# Altium PCB PCB_Adaptor_Board-v2.0.PcbDoc (part 1 of 3)
Units mm, origin at the board's own origin, x right, y up, seen from the top; angles counter-clockwise.
Board outline 135 x 88.7 mm, 2 copper layers (Top Layer, Bottom Layer), stack 1.57 mm thick; 43 components, 95 nets, 382 pads, 142 vias.
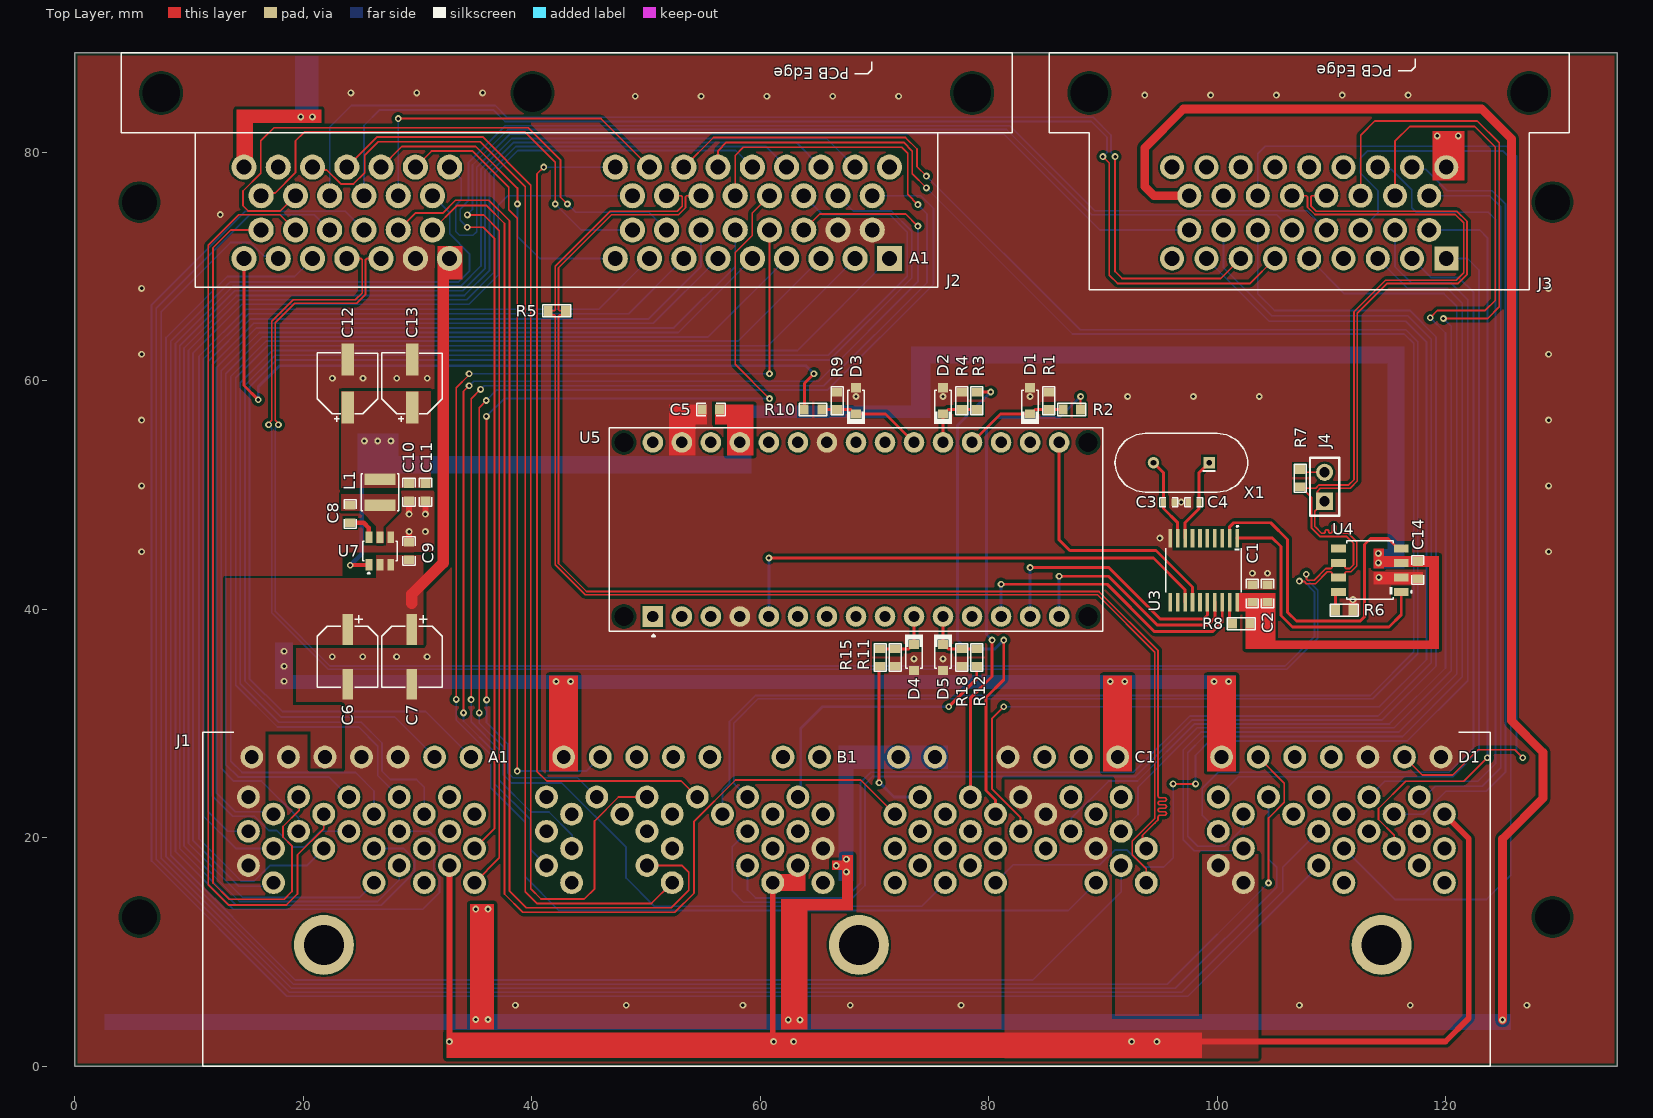
[diagram p0: Top Layer view]
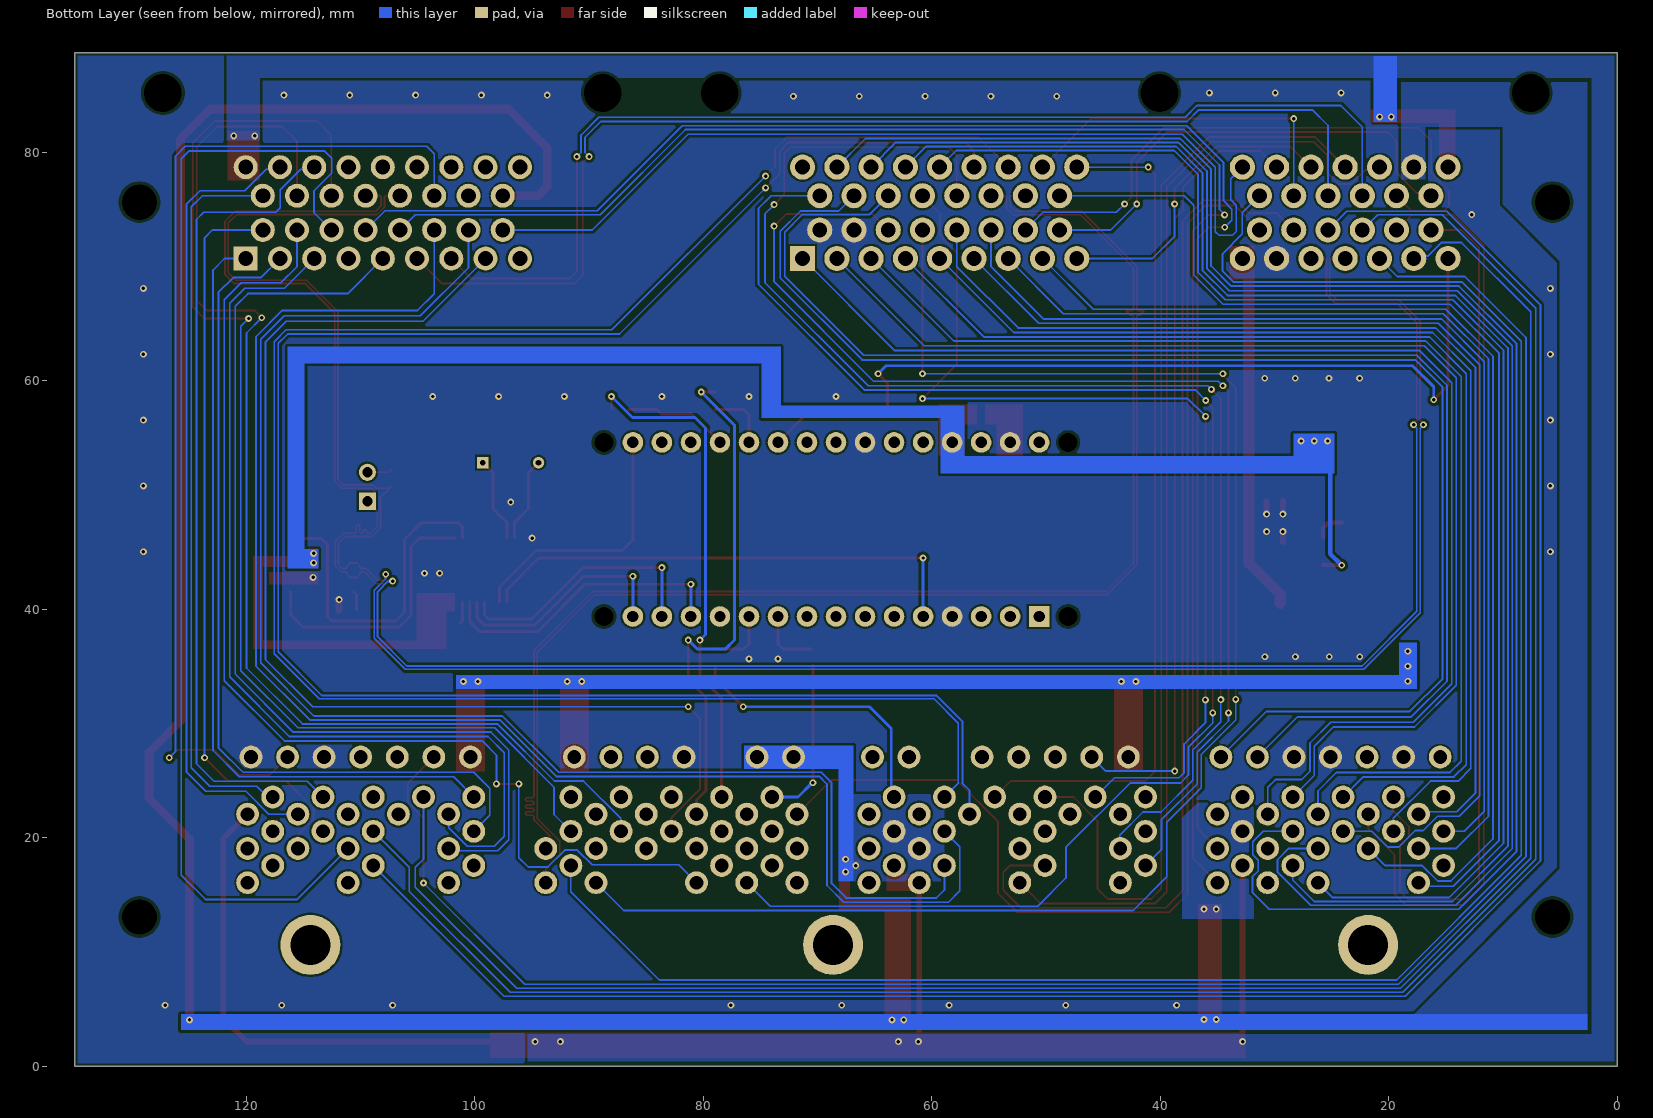
[diagram p1: Bottom Layer view, seen from below]

## Layer stack, top to bottom
Top Solder: solder mask 0.01, Solder Resist, Dk 3.5
Top Layer: signal copper 0.035
Dielectric 1: core 1.5, FR-4, Dk 4.8
Bottom Layer: signal copper 0.035
Bottom Solder: solder mask 0.01, Solder Resist, Dk 3.5

## Board outline
0,0 135,0 135,88.705 0,88.705

## Design rules (kind name [scope] priority, off if disabled: settings)
BoardOutlineClearance [All] p1: gap=0 ignorepadtopadclearanceinfootprint=FALSE except(0.254: Poly-OutlineEdge)
Clearance [All] p1: gap=0.254 ignorepadtopadclearanceinfootprint=FALSE except(0.127: Arc-Arc Arc-Track Track-Track; 0.152: Arc-THPad Track-THPad; 0.178: Track-Via Track-Fill THPad-Poly)
DiffPairsRouting [All] p1: maxlimit=0.14 minlimit=0.14 mostfreqgap=0.14 toplayer_minwidth=0.152 toplayer_maxwidth=0.152 toplayer_prefwidth=0.152 bottomlayer_minwidth=0.152 bottomlayer_maxwidth=0.152 bottomlayer_prefwidth=0.152 impedanceprofiledriven=TRUE impedanceprofileid={C063A5C5-D187-42DF-A67E-2EF729EBF0FC} impedanceprofilevalue=120.000000 maxuncoupledlength=12.7
Height [All] p1: minheight=0 maxheight=38.1 prefheight=25.4
HoleSize [All] p1: absolutevalues=TRUE maxlimit=25.4 minlimit=0.025 maxpercent=80.000 minpercent=20.000
HoleToHoleClearance [All] p1: gap=0 allowstackedmicrovias=TRUE
MatchedLengths "Schematic Matched Net Lengths_5" [InNet('CAN1_P')] p1: tolerance=0.508 checknetsindiffpair=TRUE checkdiffpairvsdiffpair=FALSE checkxsignals=FALSE checkothers=FALSE
MatchedLengths "Schematic Matched Net Lengths_4" [InNet('CAN1_N')] p2: tolerance=0.508 checknetsindiffpair=TRUE checkdiffpairvsdiffpair=FALSE checkxsignals=FALSE checkothers=FALSE
MatchedLengths "Schematic Matched Net Lengths_1" [InNet('CANHH_P')] p3: tolerance=0.508 checknetsindiffpair=TRUE checkdiffpairvsdiffpair=FALSE checkxsignals=FALSE checkothers=FALSE
MatchedLengths "Schematic Matched Net Lengths" [InNet('CANHH_N')] p4: tolerance=0.508 checknetsindiffpair=TRUE checkdiffpairvsdiffpair=FALSE checkxsignals=FALSE checkothers=FALSE
MaxMinImpedance "Schematic Impedance Constraint_5" [InNet('CAN1_P')] p1: minimum=118.0 maximum=120.0
MaxMinImpedance "Schematic Impedance Constraint_4" [InNet('CAN1_N')] p2: minimum=118.0 maximum=120.0
MaxMinImpedance "Schematic Impedance Constraint_1" [InNet('CANHH_N')] p3: minimum=118.0 maximum=120.0
MaxMinImpedance "Schematic Impedance Constraint" [InNet('CANHH_P')] p4: minimum=118.0 maximum=120.0
MinimumSolderMaskSliver [All] p1: minsoldermaskwidth=0
PolygonConnect [All] p1: connectstyle=Direct reliefconductorwidth=0.254 reliefentries=4 polygonreliefangle="90 Angle" airgapwidth=0.254
RoutingVias [All] p1: holewidth=0.3 width=0.6 viastyle="Through Hole" minholewidth=0.3 minwidth=0.6 maxholewidth=0.3 maxwidth=0.6
SilkToSilkClearance [All] p1: silktosilkclearance=0
SilkToSolderMaskClearance [IsPad] p1: minsilkscreentomaskgap=0 clearancetoexposedcopper=TRUE
SolderMaskExpansion [All] p1: expansion=0.102 istentingtop=FALSE
SupplyNets "Schematic Supply Nets_3" [InNet('GND')] p1: voltage=0.000
SupplyNets "Schematic Supply Nets_2" [InNet('AGND')] p2: voltage=0.000
SupplyNets "Schematic Supply Nets_1" [InNet('12V')] p3: voltage=0.000
SupplyNets "Schematic Supply Nets" [InNet('5V_ECU')] p4: voltage=0.000
UnRoutedNet [All] p1: checkbadconnections=TRUE
Width [All] p1: maxlimit=1 minlimit=0.152 preferedwidth=0.178 minimp=50.000000 maximp=50.000000 favimp=50.000000
22 further rules are at their usual default settings.

## Classes and differential pairs
differential pair CAN1: +CAN1_P -CAN1_N
differential pair CANHH: +CANHH_P -CANHH_N

## Components (designator, comment, footprint, x,y, rotation, side; value= is the part's Value field where it differs from the comment)
C1 "10uF" Cap-0603 103.073,41.39 r270 top
C2 "0.1uF" Cap-0603 104.396,41.39 r270 top value=100nF
C3 "22PF" Cap-0402 95.762,49.381 r180 top value=22pF
C4 "22PF" Cap-0402 97.942,49.378 r0 top value=22pF
C5 "10uF" Cap-0603 55.673,57.487 r180 top
C6 "47uF" RVT1E470M0505 23.868,35.84 r270 top
C7 "47uF" RVT1E470M0505 29.502,35.84 r270 top
C8 "0.1uF" Cap-0603 24.105,48.336 r270 top
C9 "10uF" Cap-0603 29.25,45.1 r270 top
C10 "22uF" Cap-0603 29.25,50.248 r90 top
C11 "22uF" Cap-0603 30.683,50.248 r90 top
C12 "47uF" CS1C470M-CRD54 23.884,59.783 r90 top
C13 "47uF" CS1C470M-CRD54 29.517,59.783 r90 top
C14 "0.1uF" Cap-0603 117.551,43.428 r90 top value=100nF
D1 "BZT52C5V1S-7-F" SOD-323 83.613,58.249 r90 top
D2 "BZT52C5V1S-7-F" SOD-323 75.993,58.249 r90 top
D3 "BZT52C5V1S-7-F" SOD-323 68.373,58.249 r90 top
D4 "BZT52C5V1S-7-F" SOD-323 73.453,35.781 r270 top
D5 "BZT52C5V1S-7-F" SOD-323 75.993,35.781 r270 top
J1 "1-1376430-8" 1-1376430-8 67.535,18.842 r0 top locked
J2 "6437288-3" 6437288-3 43.051,77.956 r180 top locked
J3 "6437288-2" 6437288-2 108.051,77.956 r180 top locked
J4 "826629-2" HDR1X2_ 109.398,49.454 r90 top
L1 "4.7uH" SWPA3015S4R7MT_ 26.695,50.248 r90 top
R1 "10K" Res-0603 85.253,58.249 r90 top value=10kR
R2 "18K" Res-0603 87.274,57.487 r180 top
R3 "18K" Res-0603 78.943,58.249 r270 top
R4 "10K" Res-0603 77.633,58.249 r270 top value=10kR
R5 "120R" Res-0603 42.189,66.142 r180 top locked
R6 "0R" Res-0603 111.118,39.923 r0 top
R7 "120R" Res-0603 107.265,51.485 r270 top
R8 "10K" Res-0603 102.102,38.744 r0 top value=10kR
R9 "10K" Res-0603 66.722,58.249 r90 top value=10kR
R10 "18K" Res-0603 64.617,57.487 r0 top
R11 "6.8K" Res-0603 70.503,35.781 r90 top value=6.8kR
R12 "6.8K" Res-0603 78.943,35.781 r90 top value=6.8kR
R15 "4.7K" Res-0603 71.813,35.781 r270 top
R18 "4.7K" Res-0603 77.633,35.781 r90 top
U3 "MCP2515T-I/ST" TSSOP-20 98.811,43.428 r270 top
U4 "TJA1050T/CM,118" SOP-8 113.36,43.428 r180 top
U5 "A000005" A000005 68.373,46.99 r90 top
U7 "AP63205WU-7" TSOT-23-6 26.695,45.1 r90 top
X1 "8Mhz" 71008000RW1 99.292,52.832 r180 top

## Footprints (in the part's own frame and the unit in brackets; to place one, negate y for a bottom-side part, rotate by r counter-clockwise, add the part's x,y. Pads: shape width x height; smd on the part's side, far side on the other; paste and mask are expansions set on the pad)
1-1376430-8 [mm]
  round 2 hole 1.21 paste-2539.97 mask+0: A1(-32.85,8.225) A2(-36.05,8.225) A3(-39.25,8.225) A4(-42.45,8.225) A5(-45.65,8.225) A6(-48.85,8.225) A7(-52.05,8.225) A8(-32.55,3.225) A9(-34.75,4.725) A10(-36.95,3.225) A11(-39.15,4.725) A12(-41.35,3.225) A13(-43.55,4.725) A14(-45.75,3.225) A15(-47.95,4.725) A16(-50.15,3.225) A17(-52.35,4.725) A18(-32.55,0.225) A19(-34.75,1.725) A20(-36.95,0.225) A21(-39.15,1.725) A22(-41.35,0.225) A23(-43.55,1.725) A24(-45.75,0.225) A25(-47.95,1.725) A26(-50.15,0.225) A27(-52.35,1.725) A28(-32.55,-2.775) A29(-34.75,-1.275) A30(-36.95,-2.775) A31(-39.15,-1.275) A32(-41.35,-2.775) A33(-50.15,-2.775) A34(-52.35,-1.275) B1(-2.35,8.225) B2(-5.55,8.225) B3(-11.95,8.225) B4(-15.15,8.225) B5(-18.35,8.225) B6(-21.55,8.225) B7(-24.75,8.225) B8(-2.05,3.225) B9(-4.25,4.725) B10(-6.45,3.225) B11(-8.65,4.725) B12(-10.85,3.225) B13(-13.05,4.725) B14(-15.25,3.225) B15(-17.45,4.725) B16(-19.65,3.225) B17(-21.85,4.725) B18(-24.05,3.225) B19(-26.25,4.725) B20(-2.05,0.225) B21(-4.25,1.725) B22(-6.45,0.225) B23(-8.65,1.725) B24(-15.25,0.225) B25(-17.45,1.725) B26(-24.05,0.225) B27(-26.25,1.725) B28(-2.05,-2.775) B29(-4.25,-1.275) B30(-6.45,-2.775) B31(-8.65,-1.275) B32(-15.25,-2.775) B33(-17.45,-1.275) B34(-24.05,-2.775) B35(-26.25,-1.275) C1(23.75,8.225) C2(20.55,8.225) C3(17.35,8.225) C4(14.15,8.225) C5(7.75,8.225) C6(4.55,8.225) C7(24.05,4.725) C8(21.85,3.225) C9(19.65,4.725) C10(17.45,3.225) C11(15.25,4.725) C12(13.05,3.225) C13(10.85,4.725) C14(8.65,3.225) C15(6.45,4.725) C16(4.25,3.225) C17(26.25,0.225) C18(24.05,1.725) C19(21.85,0.225) C20(19.65,1.725) C21(17.45,0.225) C22(15.25,1.725) C23(13.05,0.225) C24(10.85,1.725) C25(8.65,0.225) C26(6.45,1.725) C27(4.25,0.225) C28(26.25,-2.775) C29(24.05,-1.275) C30(21.85,-2.775) C31(13.05,-2.775) C32(10.85,-1.275) C33(8.65,-2.775) C34(6.45,-1.275) C35(4.25,-2.775) D1(52.05,8.225) D2(48.85,8.225) D3(45.65,8.225) D4(42.45,8.225) D5(39.25,8.225) D6(36.05,8.225) D7(32.85,8.225) D8(52.35,3.225) D9(50.15,4.725) D10(47.95,3.225) D11(45.75,4.725) D12(43.55,3.225) D13(41.35,4.725) D14(39.15,3.225) D15(36.95,4.725) D16(34.75,3.225) D17(32.55,4.725) D18(52.35,0.225) D19(50.15,1.725) D20(47.95,0.225) D21(45.75,1.725) D22(43.55,0.225) D23(41.35,1.725) D24(34.75,0.225) D25(32.55,1.725) D26(52.35,-2.775) D27(50.15,-1.275) D28(43.55,-2.775) D29(41.35,-1.275) D30(34.75,-2.775) D31(32.55,-1.275)
  round 5.25 hole 3.5 paste-2539.97 mask+0: MH1(46.85,-8.225) MH2(1.1,-8.225) MH3(-45.75,-8.225)
  silkscreen extent -56.35,-18.83 56.35,10.4, body extent -56.35,-26.42 56.35,10.43, height 22.7
6437288-2 [mm]
  rect 2.1x2.1 hole 1.3: B1(-12,7.25)
  round 2.1 hole 1.3: B2(-9,7.25) B3(-6,7.25) B4(-3,7.25) B5(0,7.25) B6(3,7.25) B7(6,7.25) B8(9,7.25) B9(12,7.25) B10(-10.5,4.75) B11(-7.5,4.75) B12(-4.5,4.75) B13(-1.5,4.75) B14(1.5,4.75) B15(4.5,4.75) B16(7.5,4.75) B17(10.5,4.75) B18(-10.5,1.75) B19(-7.5,1.75) B20(-4.5,1.75) B21(-1.5,1.75) B22(1.5,1.75) B23(4.5,1.75) B24(7.5,1.75) B25(10.5,1.75) B26(-12,-0.75) B27(-9,-0.75) B28(-6,-0.75) B29(-3,-0.75) B30(0,-0.75) B31(3,-0.75) B32(6,-0.75) B33(9,-0.75) B34(12,-0.75)
  round 0 hole 3.3 unplated: ""(-19.25,-7.25) ""(19.25,-7.25)
  silkscreen extent -22.75,-10.75 22.75,10, body extent -22.72,-26.72 22.78,9.78, height 28.25
6437288-3 [mm]
  rect 2.2x2.2 hole 1.3: A1(-28.25,7.25)
  round 2.2 hole 1.3: A2(-25.25,7.25) A2(-25.25,7.25) A3(-22.25,7.25) A4(-19.25,7.25) A5(-16.25,7.25) A6(-13.25,7.25) A7(-10.25,7.25) A8(-7.25,7.25) A9(-4.25,7.25) A10(-26.75,4.75) A11(-23.75,4.75) A12(-20.75,4.75) A13(-17.75,4.75) A14(-14.75,4.75) A15(-11.75,4.75) A16(-8.75,4.75) A17(-5.75,4.75) A18(-26.75,1.75) A19(-23.75,1.75) A20(-20.75,1.75) A21(-17.75,1.75) A22(-14.75,1.75) A23(-11.75,1.75) A24(-8.75,1.75) A25(-5.75,1.75) A26(-28.25,-0.75) A27(-25.25,-0.75) A28(-22.25,-0.75) A29(-19.25,-0.75) A30(-16.25,-0.75) A31(-13.25,-0.75) A32(-10.25,-0.75) A33(-7.25,-0.75) A34(-4.25,-0.75) C1(10.25,7.25) C2(13.25,7.25) C3(16.25,7.25) C4(19.25,7.25) C5(22.25,7.25) C6(25.25,7.25) C7(28.25,7.25) C8(11.75,4.75) C9(14.75,4.75) C10(17.75,4.75) C11(20.75,4.75) C12(23.75,4.75) C13(26.75,4.75) C14(11.75,1.75) C15(14.75,1.75) C16(17.75,1.75) C17(20.75,1.75) C18(23.75,1.75) C19(26.75,1.75) C20(10.25,-0.75) C21(13.25,-0.75) C22(16.25,-0.75) C23(19.25,-0.75) C24(22.25,-0.75) C25(25.25,-0.75) C26(28.25,-0.75)
  round 0 hole 3.3 unplated: ""(-35.5,-7.25) ""(3,-7.25) ""(35.5,-7.25)
  silkscreen extent -39,-10.75 39,9.75, body extent -38.95,-26.67 39.05,9.83, height 28.15
71008000RW1 [mm]
  rect 1x1 hole 0.5: 1(0,0)
  round 1 hole 0.5: 2(4.88,0)
  silkscreen extent -3.37,-2.57 8.25,2.57, body extent -3.34,-2.5 8.16,2.5, height 3.85
A000005 [mm]
  rect 1.8x1.8 hole 1: 1(-7.62,17.78)
  round 1.8 hole 1: 2(-7.62,15.24) 3(-7.62,12.7) 4(-7.62,10.16) 5(-7.62,7.62) 6(-7.62,5.08) 7(-7.62,2.54) 8(-7.62,0) 9(-7.62,-2.54) 10(-7.62,-5.08) 11(-7.62,-7.62) 12(-7.62,-10.16) 13(-7.62,-12.7) 14(-7.62,-15.24) 15(-7.62,-17.78) 16(7.62,-17.78) 17(7.62,-15.24) 18(7.62,-12.7) 19(7.62,-10.16) 20(7.62,-7.62) 21(7.62,-5.08) 22(7.62,-2.54) 23(7.62,0) 24(7.62,2.54) 25(7.62,5.08) 26(7.62,7.62) 27(7.62,10.16) 28(7.62,12.7) 29(7.62,15.24) 30(7.62,17.78)
  round 0 hole 1.651 unplated: ""(-7.62,20.32) ""(-7.62,-20.32) ""(7.62,20.32) ""(7.62,-20.32)
  silkscreen extent -9.35,-21.59 8.89,21.59, body extent -9,-21.6 9,23.4, height 12.6
Cap-0402 [mil]
  rect 18x25 smd mask+2.36: 1(-18.5,0) 2(18.5,0)
  silkscreen extent -31,-16 31,16, body extent -20,-10 20,10, height 19
Cap-0603 [mil]
  rect 30x35 smd mask+2.36: 1(-30,0) 2(30,0)
  silkscreen extent -49,-21 49,21, body extent -32,-16 31,16, height 34
CS1C470M-CRD54 [mm]
  rect 2.8x1.1 smd paste+0 mask+0.051: 1(-2.1,0) 2(2.1,0)
  silkscreen extent -3.34,-2.62 2.66,2.65, body extent -2.85,-2.65 2.85,2.65, height 5.41
HDR1X2_ [mm] "CONN HEADER VERT 2POS 2.54MM"
  rect 1.5x1.5 hole 0.9: 1(0,0)
  round 1.5 hole 0.9: 2(2.54,0)
  silkscreen extent -1.27,-1.27 3.81,1.27, body extent -1.27,-1.27 3.81,1.27, height 8.44
Res-0603 [mil]
  rect 30x35 smd: 1(-30,0) 2(30,0)
  silkscreen extent -48,-21 48,21, body extent -31,-17 31,17, height 18
RVT1E470M0505 [mm]
  rect 2.7x0.91 smd paste+0 mask+0.051: 1(-2.4,0) 2(2.4,0)
  silkscreen extent -3.64,-2.65 2.66,2.65, body extent -2.85,-2.65 2.85,2.65, height 5.4
SOD-323 [mm]
  rect 0.8x0.9 smd mask+0.055: 1(-1.15,0) 2(1.15,0)
  silkscreen extent -2.01,-0.79 0.94,0.79, body extent -1.3,-0.67 1.3,0.67, height 1.1
SOP-8 [mm]
  rect 1.3x0.7 smd: 1(-2.75,1.905) 2(-2.75,0.635) 3(-2.75,-0.635) 4(-2.75,-1.905) 5(2.75,-1.905) 6(2.75,-0.635) 7(2.75,0.635) 8(2.75,1.905)
  silkscreen extent -3.69,-2.57 2.03,2.57, body extent -3.1,-2.5 3.1,2.5, height 1.76
SWPA3015S4R7MT_ [mm]
  rect 1x2.7 smd: 1(-1.15,0) 2(1.15,0)
  silkscreen extent -1.63,-1.65 1.63,1.65, body extent -1.6,-1.6 1.6,1.6, height 1.49
TSOT-23-6 [mm]
  rect 1x0.6 smd: 1(-1.2,0.95) 2(-1.2,0) 3(-1.2,-0.95) 4(1.2,-0.95) 5(1.2,0) 6(1.2,0.95)
  silkscreen extent -1.98,-1.5 0.86,1.5, body extent -1.41,-1.45 1.41,1.45, height 1
TSSOP-20 [mm]
  rect 1.6x0.32 smd: 1(-2.8,2.925) 2(-2.8,2.275) 3(-2.8,1.625) 4(-2.8,0.975) 5(-2.8,0.325) 6(-2.8,-0.325) 7(-2.8,-0.975) 8(-2.8,-1.625) 9(-2.8,-2.275) 10(-2.8,-2.925) 11(2.8,-2.925) 12(2.8,-2.275) 13(2.8,-1.625) 14(2.8,-0.975) 15(2.8,-0.325) 16(2.8,0.325) 17(2.8,0.975) 18(2.8,1.625) 19(2.8,2.275) 20(2.8,2.925)
  silkscreen extent -3.88,-3.3 1.95,3.3, body extent -3.2,-3.25 3.2,3.25, height 1.2

## Part data
C1 C5 C9: library part CL10A106MA8NRNC, "CAP CER 10UF 25V X5R 0603", Case Code (Imperial)=0603, Case Code (Metric)=1608, Dielectric=X5R, LCSC Part Number=C96446, Manufacturer=Samsung, Max Operating Temperature=85°C, Min Operating Temperature=-55°C, Package Quantity=1, Tolerance=20%, Voltage Rating=25V, Capacitance=10uF, Case/Package=0603, Category="Ceramic Capacitors", ComponentLink1Description=https://datasheet.ciiva.com/25766/cl10a106ma8nrnc-25766562.pdf?src-supplier=Digi-Key, ComponentLink1URL=https://datasheet.ciiva.com/25766/cl10a106ma8nrnc-25766562.pdf?src-supplier=Digi-Key, Construction=Flat, Contact Plating=Tin, Lead Free="Lead Free", Length=0.063inch, Manufacturer Part Number=CL10A106MA8NRNC, Mount="Surface Mount", Packaging="Tape and Reel", Pricing 1="4000=0.03753, 8000=0.03700, 16000=0.03595, 24000=0.03515, 32000=0.03383, 40000=0.03304, 400000=0.03225 (USD)", RoHS=Yes, RoHS Compliant=Yes, Series=CL, Supplier 1=Avnet, Supplier Part Number 1=CL10A106MA8NRNC, Termination=Wraparound, Thickness=0.035inch, Width=0.031inch
C2 C14: library part CC0603JRX7R8BB104, "CAP CER 0.1UF 25V X7R 0603", Case Code (Imperial)=0603, Case Code (Metric)=1608, Dielectric=X7R, LCSC Part Number=C327087, Manufacturer=Yageo, Max Operating Temperature=125°C, Min Operating Temperature=-55°C, Tolerance=5%, Voltage Rating=25V, Case/Package=0603, ComponentLink1Description=https://datasheet.ciiva.com/11465/upy-gphc-x7r-6-3v-to-50v-8-11465031.pdf?src-supplier=Avnet, ComponentLink1URL=https://datasheet.ciiva.com/11465/upy-gphc-x7r-6-3v-to-50v-8-11465031.pdf?src-supplier=Avnet, Construction=Flat, Halogen Free="Halogen Free", Height=0.8mm, Item Type=Capacitors, Lead Free="Lead Free", Length=1.6mm, Manufacturer Part Number=CC0603JRX7R8BB104, Mounting Technology="Surface Mount", Packaging="Tape and Reel", Pricing="1=0.1, 10=0.057, 50=0.039, 100=0.0335, 500=0.02436, 1000=0.0215 (USD)", RoHS=Yes, RoHS Compliant=Yes, Series=CC, Stock=448767, Supplier=Digikey, Termination=SMD/SMT, Thickness=0.035inch, Voltage Rating (DC)=25V, Weight=7.1E-05oz, Width=0.031inch
C3 C4: library part CC0402JRNPO9BN220, "CAP CER 22PF 50V C0G/NPO 0402", Case Code (Imperial)=0402, Case Code (Metric)=1005, Dielectric=C0G, Dielectric Material=Ceramic, Insulation Resistance=100GR, LCSC Part Number=C106203, Manufacturer=Yageo, Max Operating Temperature=125°C, Min Operating Temperature=-55°C, Package Quantity=1, Supplier Part Number 1=9105957, Temperature Coefficient=30ppm/°C, Tolerance=5%, Voltage=50V, Case/Package=0402, Category="Ceramic Capacitors", ComponentLink1Description=https://datasheet.ciiva.com/5789/1443161-5789509.pdf?src-supplier=Farnell, ComponentLink1URL=https://datasheet.ciiva.com/5789/1443161-5789509.pdf?src-supplier=Farnell, ComponentLink2Description=https://datasheet.ciiva.com/8033/1443161-8033606.pdf?src-supplier=Element14, ComponentLink2URL=https://datasheet.ciiva.com/8033/1443161-8033606.pdf?src-supplier=Element14, ComponentLink3Description=https://datasheet.ciiva.com/7656/1132289-7656615.pdf?src-supplier=Element14, ComponentLink3URL=https://datasheet.ciiva.com/7656/1132289-7656615.pdf?src-supplier=Element14, ComponentLink4Description=https://datasheet.ciiva.com/8033/1443161-8033607.pdf?src-supplier=Element14, ComponentLink4URL=https://datasheet.ciiva.com/8033/1443161-8033607.pdf?src-supplier=Element14, ComponentLink5Description=https://datasheet.ciiva.com/8033/1443161-8033605.pdf?src-supplier=Element14, ComponentLink5URL=https://datasheet.ciiva.com/8033/1443161-8033605.pdf?src-supplier=Element14, ComponentLink6Description=https://datasheet.ciiva.com/143/mlccorderingcode-143987.pdf?src-supplier=Digi-Key, ComponentLink6URL=https://datasheet.ciiva.com/143/mlccorderingcode-143987.pdf?src-supplier=Digi-Key, ComponentLink7Description=https://datasheet.ciiva.com/143/mlccorderingcode-143986.pdf?src-supplier=Digi-Key, ComponentLink7URL=https://datasheet.ciiva.com/143/mlccorderingcode-143986.pdf?src-supplier=Digi-Key, ComponentLink8Description=https://datasheet.ciiva.com/143/mlccorderingcode-143988.pdf?src-supplier=Digi-Key, ComponentLink8URL=https://datasheet.ciiva.com/143/mlccorderingcode-143988.pdf?src-supplier=Digi-Key, ComponentLink9Description=https://datasheet.ciiva.com/5425/upy-gp-np0-16v-to-50v-8-5425483.pdf?src-supplier=Mouser, ComponentLink9URL=https://datasheet.ciiva.com/5425/upy-gp-np0-16v-to-50v-8-5425483.pdf?src-supplier=Mouser, ComponentLink10Description=https://datasheet.ciiva.com/15189/getdatasheetpartid-370074-15189117.pdf?src-supplier=Verical, ComponentLink10URL=https://datasheet.ciiva.com/15189/getdatasheetpartid-370074-15189117.pdf?src-supplier=Verical, Depth=0.5mm, Height=0.5mm, Item Type=Capacitor, Lead Free="Lead Free", Length=1mm, Manufacturer Part Number=CC0402JRNPO9BN220, Mounting Technology="Surface Mount", Packaging="Tape and Reel", Pins=2, Pricing 1="10000=0.00220, 40000=0.00210, 150000=0.00200, 400000=0.00190, 1000000=0.00180 (USD)", Radiation Hardening=No, Reach SVHC Compliant=Yes, Resistor Type=Ceramic, RoHS=Yes, RoHS Compliant=Yes, Series=CC, Stock 1=200000, Supplier 1="Future Electronics", Termination=SMD/SMT, Thickness=0.022inch, Voltage Rating=50V, Voltage Rating (DC)=50V, Width=0.02inch
C6 C7: library part RVT1E470M0505, "47uF 25V 49mA@120Hz ±20% SMD,D5xL5.4mm Aluminum Electrolytic Capacitors - SMD ROHS", LCSC Part Number=C2977553, Manufacturer=ROQANG, Package=SMD,D5xL5.4mm, ComponentLink1Description=LCSC, ComponentLink1URL=https://www.lcsc.com/product-detail/Aluminum-Electrolytic-Capacitors-SMD_ROQANG-RVT1E470M0505_C2977553.html, Item Type=Capacitor, Manufacturer Part Number=RVT1E470M0505
C8: library part CL10B104KB8NNNC, "CAP CER 0.1UF 50V X7R 0603", Capacitance=100nF, Case Code (Imperial)=0603, Case Code (Metric)=1608, Dielectric=X7R, LCSC Part Number=C1591, Manufacturer=Samsung, Max Operating Temperature=125°C, Min Operating Temperature=-55°C, Package Quantity=1, Supplier Part Number 1=1276-1000-1-ND, Tolerance=10%, Voltage=50V, Case/Package=0603, Category="Ceramic Capacitors", ComponentLink1Description=https://datasheet.ciiva.com/25803/cl10b104kb8nnnc-25803393.pdf?src-supplier=Digi-Key, ComponentLink1URL=https://datasheet.ciiva.com/25803/cl10b104kb8nnnc-25803393.pdf?src-supplier=Digi-Key, ComponentLink2Description=https://datasheet.ciiva.com/26838/getdatasheetpartid-89097-26838411.pdf?src-supplier=Verical, ComponentLink2URL=https://datasheet.ciiva.com/26838/getdatasheetpartid-89097-26838411.pdf?src-supplier=Verical, ComponentLink3Description=https://datasheet.ciiva.com/29198/456651-da-01-en-vs-kondensator-0605-29198839.pdf?src-supplier=Conrad, ComponentLink3URL=https://datasheet.ciiva.com/29198/456651-da-01-en-vs-kondensator-0605-29198839.pdf?src-supplier=Conrad, Construction=Flat, Contact Plating=Tin, Depth=0.8mm, Height=0.8mm, Lead Free="Lead Free", Length=1.6mm, Manufacturer Part Number=CL10B104KB8NNNC, Material=Ceramic, Mount="Surface Mount", Packaging="Tape and Reel", Pricing 1="1=0.10000, 10=0.03000, 50=0.01640, 100=0.01340, 500=0.00954, 1000=0.00750 (USD)", Radiation Hardening=No, RoHS=Yes, RoHS Compliant=Yes, Series=CL, Stock 1=3998791, Supplier 1=Digi-Key, Thickness=0.035inch, Voltage Rating=50V, Voltage Rating (DC)=50V, Width=0.031inch
C10 C11: library part HGC0603R5226M160NTHJ, "16V 22uF X5R ±20% 0603 Multilayer Ceramic Capacitors MLCC - SMD/SMT ROHS", LCSC Part Number=C22367828, Manufacturer=Chinocera, Package=0603, ComponentLink1Description=LCSC, ComponentLink1URL=https://www.lcsc.com/product-detail/Multilayer-Ceramic-Capacitors-MLCC-SMD-SMT_Chinocera-HGC0603R5226M160NTHJ_C22367828.html, Item Type=Capacitor, Manufacturer Part Number=HGC0603R5226M160NTHJ
C12 C13: library part CS1C470M-CRD54, "47uF 16V ±20% SMD,D5xL5.4mm Aluminum Electrolytic Capacitors - SMD ROHS", LCSC Part Number=C96178, Manufacturer=ST(Semtech), Package=SMD,D5xL5.4mm, ComponentLink1Description=LCSC, ComponentLink1URL=https://www.lcsc.com/product-detail/Aluminum-Electrolytic-Capacitors-SMD_ST-Semtech-CS1C470M-CRD54_C96178.html, Item Type=Capacitors, Manufacturer Part Number=CS1C470M-CRD54
D1 D2 D3 D4 D5: "DIODE ZENER 5.1V 200MW SOD323", Forward Voltage=900mV, LCSC Part Number=C151348, Manufacturer=Diodes, Max Operating Temperature=150°C, Max Power Dissipation=200mW, Max Reverse Current=1uA, Min Operating Temperature=-65°C, Output Current=50mA, Package Quantity=3000, Test Current=5mA, Tolerance=6%, Voltage Rating (DC)=5.1V, ComponentLink1Description=https://datasheet.ciiva.com/15142/getdatasheetpartid-61177-15142295.pdf?src-supplier=Verical, ComponentLink1URL=https://datasheet.ciiva.com/15142/getdatasheetpartid-61177-15142295.pdf?src-supplier=Verical, ComponentLink2Description=https://datasheet.ciiva.com/25623/0900766b8104c1f1-25623741.pdf?src-supplier=Rs, ComponentLink2URL=https://datasheet.ciiva.com/25623/0900766b8104c1f1-25623741.pdf?src-supplier=Rs, Contact Plating=Tin,Matte, ESD Protection=No, Height=1mm, Impedance=60R, Item Type=Diodes, Lead Free="Lead Free", Length=1.8mm, Manufacturer Part Number=BZT52C5V1S-7-F, Max Reverse Leakage Current=1uA, Mounting Technology="Surface Mount", Packaging="Tape and Reel", Pins=2, Power Dissipation=200mW, Power Rating=200mW, Pricing="3000=0.0261, 9000=0.0252, 15000=0.0248, 60000=0.0236, 90000=0.0229 (USD)", Radiation Hardening=No, RoHS=Yes, RoHS Compliant=Yes, Series=-, Stock=30000, Supplier="Future Electronics", Termination=SMD/SMT, Voltage Tolerance=6%, Weight=0.000173oz, Width=1.4mm, Working Voltage=5.1V, Zener Current=5mA, Zener Voltage=5.1V
J1: "025/040 135POS CAP ASSY H TIN", Manufacturer="TE Connectivity Raychem", Supplier Part Number 1=17-1-1376430-8-ND, Category=Connectors, Item Type=Connector, Manufacturer Part Number=1-1376430-8, Pricing 1="1=11.55, 12=10.02667 (USD)", RoHS=Yes, Stock 1=1632, Supplier 1=Digikey
J2: "CONN HEADER R/A 60POS 3MM", Manufacturer="TE Connectivity", Supplier Part Number 1=A122211-ND, Category="Headers and Wire Housings", ComponentLink1Description=https://datasheet.ciiva.com/11742/0900766b80fa0058-11742813.pdf?src-supplier=Rs, ComponentLink1URL=https://datasheet.ciiva.com/11742/0900766b80fa0058-11742813.pdf?src-supplier=Rs, ComponentLink2Description=https://datasheet.ciiva.com/31837/18928ddetrolleractionshowdocdocidcatalogsection7f1308072-2-gad-lit-31837713.pdf?src-supplier=Onlinecomponents.com, ComponentLink2URL=https://datasheet.ciiva.com/31837/18928ddetrolleractionshowdocdocidcatalogsection7f1308072-2-gad-lit-31837713.pdf?src-supplier=Onlinecomponents.com, ComponentLink3Description=https://datasheet.ciiva.com/9491/eng-cs-1308072-2-gad-lit-amp-superseal-0608-9491339.pdf?src-supplier=Avnet, ComponentLink3URL=https://datasheet.ciiva.com/9491/eng-cs-1308072-2-gad-lit-amp-superseal-0608-9491339.pdf?src-supplier=Avnet, Item Type=Connector, Manufacturer Part Number=6437288-3, Pricing 1="1=23.56, 16=19.44938, 104=16.70635, 504=15.95829 (USD)", RoHS=Yes, Stock 1=2119, Supplier 1=Digikey
J3: "CONN HEADER R/A 34POS 3MM", Manufacturer="TE Connectivity", Supplier Part Number=69AH5934, ComponentLink1Description=https://datasheet.ciiva.com/11755/0900766b80f79e47-11755892.pdf?src-supplier=Rs, ComponentLink1URL=https://datasheet.ciiva.com/11755/0900766b80f79e47-11755892.pdf?src-supplier=Rs, ComponentLink2Description=https://datasheet.ciiva.com/9496/eng-cs-1308072-2-gad-lit-amp-superseal-0608-9496917.pdf?src-supplier=Avnet, ComponentLink2URL=https://datasheet.ciiva.com/9496/eng-cs-1308072-2-gad-lit-amp-superseal-0608-9496917.pdf?src-supplier=Avnet, Item Type=Connectors, Manufacturer Part Number=6437288-2, Pricing="1=21.65, 5=21.15, 10=20.79, 25=20.4, 50=19.97 (USD)", RoHS=Yes, Stock=15, Supplier=Avnet
J4: "CONN HEADER VERT 2POS 2.54MM", Color=Green, Current Rating=3A, Flammability Rating="UL94 V-0", High Temperature Housing=No, LCSC Part Number=C86471, Manufacturer="TE Connectivity", Manufacturer Part Number=8266292, Max Operating Temperature=105°C, Min Operating Temperature=-65°C, Package Quantity=3000, Supplier Part Number 1=1361864, Board Standoff="No (Without)", Category="Board to Board Connectors", ComponentLink1Description=https://datasheet.ciiva.com/11746/0900766b80d7c358-11746248.pdf?src-supplier=RSComponents, ComponentLink1URL=https://datasheet.ciiva.com/11746/0900766b80d7c358-11746248.pdf?src-supplier=RSComponents, ComponentLink2Description=https://datasheet.ciiva.com/30224/8266292-30224019.pdf?src-supplier=Onlinecomponents.com, ComponentLink2URL=https://datasheet.ciiva.com/30224/8266292-30224019.pdf?src-supplier=Onlinecomponents.com, ComponentLink3Description=https://datasheet.ciiva.com/29369/001094754-da-01-en-stiftleiste-1-reihig-0-0826629-2-29369600.pdf?src-supplier=Conrad, ComponentLink3URL=https://datasheet.ciiva.com/29369/001094754-da-01-en-stiftleiste-1-reihig-0-0826629-2-29369600.pdf?src-supplier=Conrad, ComponentLink4Description=https://datasheet.ciiva.com/6857/eng-cd-826629-aa-basefilename-6857135.pdf?src-supplier=Digi-Key, ComponentLink4URL=https://datasheet.ciiva.com/6857/eng-cd-826629-aa-basefilename-6857135.pdf?src-supplier=Digi-Key, ComponentLink5Description=https://datasheet.ciiva.com/14120/eh826629-draw-14120837.pdf?src-supplier=Distrelec, ComponentLink5URL=https://datasheet.ciiva.com/14120/eh826629-draw-14120837.pdf?src-supplier=Distrelec, Connector Type=Plug,Header,Pin, Contact Gender=Male, Contact Material=Bronze, Contact Mating Length=6.7mm, Contact Plating=Gold,Tin, Contact Post Length=0.1259inch, Contact Protection="No (Without)", Contact Shape=Square, Contact Type="Male Pin", Depth=2.5mm, ELV=Compliant, Gasket="No (Without)", Gender=Male, High Speed Serial Data Connector=No, Housing Color=Green, Housing Material=PBT, Item Type="Male Header", Keyed=No, Lead Free="Lead Free", Length=5.08mm, Mating Alignment="No (Without)", Mating Connector Lock="No (Without)", Mount="Straddle Mount", Number of Contacts=2, Number of Positions=2, Number of Rows=1, Orientation=Straight, Packaging=Carton, PCB Mount Retention=Without, PCB Mounting Orientation=Vertical, Pitch=2.54mm, Plating Thickness=0.8um, Radiation Hardening=No, REACH SVHC="No SVHC", RoHS=Yes, Row Spacing=2.54mm, Selectively Loaded="No (Without)", Series="AMPMODU MOD II", Stabilizers="No (Without)", Strain Relief="No (Without)", Supplier 1=RSComponents, Termination="Through Hole"
L1: library part SWPA3015S4R7MT, "Fixed Ind 4.720%UH 0.125 Ohm 1400", LCSC Part Number=C19398, Manufacturer=Sunlord, Supplier Part Number 1=3442-SWPA3015S4R7MTCT-ND, Category="Fixed Inductors", Manufacturer Part Number=SWPA3015S4R7MT, Pricing 1="1=0.41000, 10=0.36400, 25=0.31800, 50=0.27280, 100=0.25000, 250=0.22724, 500=0.21362, 1000=0.16362 (USD)", RoHS=Yes, RoHS Compliant=Yes, Stock 1=2802, Supplier 1=Digi-Key
R1 R4 R9: library part RT0603BRD0710KL, "RES SMD 10K OHM 0.1% 1/10W 0603", Case/Package=0603, LCSC Part Number=C95204, Manufacturer=Yageo, Max Operating Temperature=155°C, Min Operating Temperature=-55°C, Package Height=0.45mm, Package Length=1.6mm, Package Style=SMTMeter, Package Width=0.8mm, Power=100mW, Rated Temperature=70°C, Resistor Type="FIXED RESISTOR", Supplier Part Number 1=1991391P, Temperature Coefficient=25ppm/°C, Tolerance=0.1%, Working Voltage=75V, Category="Chip SMD Resistors", ComponentLink1Description=https://datasheet.ciiva.com:443/pdfs/VipMasterIC/IC/YAGO/YAGO-S-A0008510989/YAGO-S-A0008510989-1.pdf?src-supplier=IHS+Markit, ComponentLink1URL=https://datasheet.ciiva.com:443/pdfs/VipMasterIC/IC/YAGO/YAGO-S-A0008510989/YAGO-S-A0008510989-1.pdf?src-supplier=IHS+Markit, ComponentLink2Description=https://datasheet.ciiva.com/5624/pyu-rt-1-to-0-05-rohs-l-4-5624351.pdf?src-supplier=Mouser, ComponentLink2URL=https://datasheet.ciiva.com/5624/pyu-rt-1-to-0-05-rohs-l-4-5624351.pdf?src-supplier=Mouser, ComponentLink3Description=https://datasheet.ciiva.com/29721/pyu-rt-1-to-0-05-rohs-l-4-29721177.pdf?src-supplier=Digi-Key, ComponentLink3URL=https://datasheet.ciiva.com/29721/pyu-rt-1-to-0-05-rohs-l-4-29721177.pdf?src-supplier=Digi-Key, Construction=Chip, Item Type=Resistor, Manufacturer Part Number=RT0603BRD0710KL, Mounting Technology="Surface Mount", Packaging="Tape and Reel", Pins=2, Pricing 1="100=0.29800, 250=0.27800, 500=0.25900, 1000=0.23700 (GBP)", Reach SVHC Compliant=Yes, RoHS=Yes, RoHS Compliant=Yes, Stock 1=20510, Supplier 1=Rs, Technology="THIN FILM", Termination=Wraparound
R2 R3 R10: library part RC0603FR-0718KL, "RES 18K OHM 1% 1/10W 0603", Case Code (Imperial)=0603, Case Code (Metric)=1608, LCSC Part Number=C114610, Manufacturer=Yageo, Max Operating Temperature=155°C, Max Power Dissipation=100mW, Min Operating Temperature=-55°C, Package Quantity=5000, Resistance=18kR, Resistance Tolerance=1%, Resistor Type="Thick Film", Supplier Part Number 1=311-18.0KHRCT-ND, Temperature Coefficient=100ppm/°C, Voltage Rating=75V, Voltage Rating (DC)=50V, Case/Package=0603, Category="Chip SMD Resistors", ComponentLink1Description=https://datasheet.ciiva.com/11819/0900766b80f96399-11819270.pdf?src-supplier=RSComponents, ComponentLink1URL=https://datasheet.ciiva.com/11819/0900766b80f96399-11819270.pdf?src-supplier=RSComponents, ComponentLink2Description=https://datasheet.ciiva.com/7746/443971-7746268.pdf?src-supplier=Element14, ComponentLink2URL=https://datasheet.ciiva.com/7746/443971-7746268.pdf?src-supplier=Element14, ComponentLink3Description=https://datasheet.ciiva.com/7746/443971-7746269.pdf?src-supplier=Element14, ComponentLink3URL=https://datasheet.ciiva.com/7746/443971-7746269.pdf?src-supplier=Element14, ComponentLink4Description=https://datasheet.ciiva.com/15189/getdatasheetpartid-325162-15189626.pdf?src-supplier=Verical, ComponentLink4URL=https://datasheet.ciiva.com/15189/getdatasheetpartid-325162-15189626.pdf?src-supplier=Verical, ComponentLink5Description=https://datasheet.ciiva.com/46395/443971-46395003.pdf?src-supplier=Element14, ComponentLink5URL=https://datasheet.ciiva.com/46395/443971-46395003.pdf?src-supplier=Element14, ComponentLink6Description=https://datasheet.ciiva.com/12558/rc0603-272842-12558744.pdf?src-supplier=Mouser, ComponentLink6URL=https://datasheet.ciiva.com/12558/rc0603-272842-12558744.pdf?src-supplier=Mouser, Construction=Rectangular, Depth=0.8mm, Features="Moisture Resistant", Height=0.45mm, Lead Free="Lead Free", Length=1.6mm, Manufacturer Part Number=RC0603FR-0718KL, Military Standard=Not, Number of Pins=2, Number of Terminations=2, Packaging="Tape and Reel", Power Rating=100mW, Pricing 1="1=0.10000, 10=0.02300, 100=0.00930, 1000=0.00417, 2500=0.00362 (USD)", Pricing 2="1=0.10000, 10=0.02300, 100=0.00930, 1000=0.00417, 2500=0.00362 (USD)", REACH SVHC=Unknown, RoHS=Yes, RoHS Compliant=Yes, Series=RC, Size Code=0603, Stock 1=1173301, Stock 2=1087850, Supplier 1=Digi-Key, Supplier 2=Digi-Key, Supplier Part Number 2=311-30.0KHRCT-ND, Technology="THICK FILM", Termination=SMD/SMT, Tolerance=1%, Weight=7.1E-05oz, Width=0.8mm
R5: library part RC0603FR-07120RL, "RES 120 OHM 1% 1/10W 0603", Case Code (Imperial)=0603, Case Code (Metric)=1608, LCSC Part Number=C114640, Manufacturer=Yageo, Max Operating Temperature=155°C, Max Power Dissipation=100mW, Min Operating Temperature=-55°C, Package Quantity=1, Resistance Tolerance=1%, Resistor Type="Thick Film", Supplier Part Number 1=311-120HRCT-ND, Temperature Coefficient=100ppm/°C, Voltage Rating=50V, Case/Package=0603, Category="Chip SMD Resistors", ComponentLink1Description=https://datasheet.ciiva.com/2553/pyu-r-int-thick-7-2553512.pdf?src-supplier=Digi-Key, ComponentLink1URL=https://datasheet.ciiva.com/2553/pyu-r-int-thick-7-2553512.pdf?src-supplier=Digi-Key, ComponentLink2Description=https://datasheet.ciiva.com/7746/443971-7746248.pdf?src-supplier=Element14, ComponentLink2URL=https://datasheet.ciiva.com/7746/443971-7746248.pdf?src-supplier=Element14, ComponentLink3Description=https://datasheet.ciiva.com/2553/pyu-r-int-thick-7-2553513.pdf?src-supplier=Digi-Key, ComponentLink3URL=https://datasheet.ciiva.com/2553/pyu-r-int-thick-7-2553513.pdf?src-supplier=Digi-Key, ComponentLink4Description=https://datasheet.ciiva.com/7746/443971-7746249.pdf?src-supplier=Element14, ComponentLink4URL=https://datasheet.ciiva.com/7746/443971-7746249.pdf?src-supplier=Element14, ComponentLink5Description=https://datasheet.ciiva.com/2553/pyu-r-int-thick-7-2553514.pdf?src-supplier=Digi-Key, ComponentLink5URL=https://datasheet.ciiva.com/2553/pyu-r-int-thick-7-2553514.pdf?src-supplier=Digi-Key, ComponentLink6Description=https://datasheet.ciiva.com/46395/443971-46395021.pdf?src-supplier=Element14, ComponentLink6URL=https://datasheet.ciiva.com/46395/443971-46395021.pdf?src-supplier=Element14, Construction=Rectangular, Depth=0.8mm, Features="Moisture Resistant", Height=0.022inch, Item Type=Resistor, Lead Free="Lead Free", Length=1.6mm, Manufacturer Part Number=RC0603FR-07120RL, Military Standard=Not, Number of Pins=2, Number of Terminations=2, Packaging="Tape and Reel", Power Rating=100mW, Pricing 1="1=0.10000, 10=0.02400, 100=0.00970, 1000=0.00436, 2500=0.00378 (USD)", REACH SVHC="No SVHC", Resistance=120R, RoHS=Yes, RoHS Compliant=Yes, Series=RC, Size Code=0603, Stock 1=839061, Supplier 1=Digi-Key, Termination=SMD/SMT, Tolerance=1%, Voltage Rating (DC)=50V, Width=0.031inch
R6: library part RC0603JR-070RL, "RES 0 OHM JUMPER 1/10W 0603", Case Code (Imperial)=0603, Case Code (Metric)=1608, LCSC Part Number=C95177, Manufacturer=Yageo, Max Operating Temperature=155°C, Max Power Dissipation=100mW, Min Operating Temperature=-55°C, Package Quantity=5000, Resistance=0mR, Resistance Tolerance=5%, Resistor Type="Thick Film", Supplier Part Number 1=311-0.0GRCT-ND, Temperature Coefficient=200ppm/°C, Tolerance=1%, Voltage Rating=50V, Case/Package=0603, Category="Chip SMD Resistors", Construction=Rectangular, Contact Plating=Tin,Matte, Depth=0.8mm, Features="Moisture Resistant", Height=0.45mm, Item Type=Resistor, Lead Free="Lead Free", Length=1.6mm, Manufacturer Part Number=RC0603JR-070RL, Military Standard=Not, Number of Pins=2, Number of Terminations=2, Packaging="Tape and Reel", Power Rating=100mW, Pricing 1="1=0.10000, 10=0.01700, 25=0.01240, 50=0.00960, 100=0.00700, 250=0.00536, 500=0.00430, 1000=0.00316 (USD)", Radiation Hardening=No, Reach SVHC Compliant="No SVHC", RoHS=Yes, RoHS Compliant=Yes, Series=RC, Size Code=0603, Stock 1=18081776, Supplier 1=Digi-Key, Technology="THICK FILM", Termination=SMD/SMT, Voltage Rating (DC)=50V, Width=0.8mm
R7: library part RC0603JR-07120RL, "RES 120 OHM 5% 1/10W 0603", LCSC Part Number=C114681, Manufacturer=Yageo, Supplier Part Number=4045720, Voltage Rating (AC)=50V, Category="Chip SMD Resistors", ComponentLink1Description=https://datasheet.ciiva.com/15189/getdatasheetpartid-326532-15189850.pdf?src-supplier=Verical, ComponentLink1URL=https://datasheet.ciiva.com/15189/getdatasheetpartid-326532-15189850.pdf?src-supplier=Verical, ComponentLink2Description=https://datasheet.ciiva.com/2518/pyu-r-int-thick-7-2518850.pdf?src-supplier=Digi-Key, ComponentLink2URL=https://datasheet.ciiva.com/2518/pyu-r-int-thick-7-2518850.pdf?src-supplier=Digi-Key, ComponentLink3Description=https://datasheet.ciiva.com/2518/pyu-r-int-thick-7-2518851.pdf?src-supplier=Digi-Key, ComponentLink3URL=https://datasheet.ciiva.com/2518/pyu-r-int-thick-7-2518851.pdf?src-supplier=Digi-Key, ComponentLink4Description=https://datasheet.ciiva.com/2518/pyu-r-int-thick-7-2518852.pdf?src-supplier=Digi-Key, ComponentLink4URL=https://datasheet.ciiva.com/2518/pyu-r-int-thick-7-2518852.pdf?src-supplier=Digi-Key, ComponentLink5Description=https://datasheet.ciiva.com/46395/443971-46395070.pdf?src-supplier=Element14, ComponentLink5URL=https://datasheet.ciiva.com/46395/443971-46395070.pdf?src-supplier=Element14, ComponentLink6Description=https://datasheet.ciiva.com/12555/rc0603-272842-12555246.pdf?src-supplier=Mouser, ComponentLink6URL=https://datasheet.ciiva.com/12555/rc0603-272842-12555246.pdf?src-supplier=Mouser, Item Type=Resistor, Manufacturer Part Number=RC0603JR-07120RL, Pricing="5000=0.0015, 75000=0.0015, 250000=0.0014, 750000=0.0013, 2500000=0.0012 (USD)", RoHS=Yes, Stock=570000, Supplier="Future Electronics"
R8: library part RK73G1JTTD1002F, "RES 10K OHM 1% 1/10W 0603", Case Code (Imperial)=0603, Case Code (Metric)=1608, LCSC Part Number=C362180, Max Operating Temperature=125°C, Min Operating Temperature=-55°C, Power Rating=100mW, Supplier Part Number=2019-RK73G1JTTD1002FCT-ND, Temperature Coefficient=50ppm/°C, Tolerance=1%, Voltage Rating=75V, Case/Package=0603, Category="Chip SMD Resistors", ComponentLink1Description=LCSC, ComponentLink2Description=http://www.mouser.com/ds/2/219/RK73G-9863.pdf?src-supplier=Mouser, ComponentLink2URL=http://www.mouser.com/ds/2/219/RK73G-9863.pdf?src-supplier=Mouser, Construction=Rectangular, Depth=0.8mm, Item Type=Resistor, Length=1.6mm, Military Standard=Not, Packaging="Tape and Reel", Pricing="1=0.22, 10=0.118, 50=0.0812, 100=0.0699, 500=0.0513, 1000=0.04545 (USD)", RoHS=Yes, RoHS Compliant=Yes, Series=RK73G, Stock=249394, Supplier=Digi-Key, Termination=SMD/SMT
R11 R12: library part RT0603BRE076K8L, "RES SMD 6.8K OHM 0.1% 1/10W 0603", Case/Package=0603, LCSC Part Number=C705876, Manufacturer=Yageo, Max Operating Temperature=155°C, Min Operating Temperature=-55°C, Package Height=0.45mm, Package Length=1.6mm, Package Style=SMTMeter, Package Width=0.8mm, Power=100mW, Rated Temperature=70°C, Resistor Type="FIXED RESISTOR", Supplier Part Number 1=603-RT0603BRE076K8L, Temperature Coefficient=50ppm/°C, Tolerance=0.1%, Working Voltage=75V, Category="Chip SMD Resistors", ComponentLink1Description=https://datasheet.ciiva.com:443/pdfs/VipMasterIC/IC/YAGO/YAGO-S-A0008510989/YAGO-S-A0008510989-1.pdf?src-supplier=IHS+Markit, ComponentLink1URL=https://datasheet.ciiva.com:443/pdfs/VipMasterIC/IC/YAGO/YAGO-S-A0008510989/YAGO-S-A0008510989-1.pdf?src-supplier=IHS+Markit, ComponentLink2Description=https://datasheet.ciiva.com/2584/pyu-rt-1-to-0-05-rohs-l-5-2584607.pdf?src-supplier=Digi-Key, ComponentLink2URL=https://datasheet.ciiva.com/2584/pyu-rt-1-to-0-05-rohs-l-5-2584607.pdf?src-supplier=Digi-Key, Construction=Chip, Item Type=Resistor, Manufacturer Part Number=RT0603BRE076K8L, Mounting Technology="Surface Mount", Packaging="Tape and Reel", Pins=2, Pricing 1="1=0.32000, 10=0.26800, 50=0.26800, 100=0.10500, 1000=0.04400, 10000=0.03600 (USD)", Reach SVHC Compliant=Yes, RoHS=Yes, RoHS Compliant=Yes, Stock 1=1191, Supplier 1=Mouser, Technology="THIN FILM", Termination=Wraparound
R15 R18: library part RC0603JR-074K7L, "RES SMD 4.7K OHM 5% 1/10W 0603", Case Code (Imperial)=0603, Case Code (Metric)=1608, LCSC Part Number=C105428, Manufacturer=Yageo, Max Operating Temperature=155°C, Min Operating Temperature=-55°C, Power Rating=100mW, Resistance=4.7kR, Supplier Part Number 1=311-4.7KGRCT-ND, Temperature Coefficient=100ppm/°C, Tolerance=5%, Voltage Rating=50V, Case/Package=0603, ComponentLink1Description=http://www.farnell.com/datasheets/443971.pdf?src-supplier=Element14, ComponentLink1URL=http://www.farnell.com/datasheets/443971.pdf?src-supplier=Element14, Composition="Thick Film", Depth=0.8mm, Item Type=Resistor, Lead Free="Lead Free", Length=1.6mm, Manufacturer Part Number=RC0603JR-074K7L, Military Standard=Not, Number of Pins=2, Packaging="Tape and Reel", Pricing 1="1=0.1, 10=0.02, 100=0.0081, 1000=0.00362, 2500=0.00314 (USD)", REACH SVHC="No SVHC", Stock 1=19706643, Supplier 1=Digi-Key, Termination=SMD/SMT, Voltage Rating (DC)=50V, Width=0.8mm
U3: "IC CAN CONTROLLER W/SPI 20TSSOP", Case/Package=TSSOP, LCSC Part Number=C185941, Manufacturer=Microchip, Max Operating Temperature=85°C, Max Supply Current=10mA, Max Supply Voltage=5.5V, Min Operating Temperature=-40°C, Min Supply Voltage=2.7V, Operating Supply Voltage=5V, Package Quantity=2500, ComponentLink1Description=https://datasheet.ciiva.com/1495/1669372-1495293.pdf?src-supplier=Element14, ComponentLink1URL=https://datasheet.ciiva.com/1495/1669372-1495293.pdf?src-supplier=Element14, ComponentLink2Description=https://datasheet.ciiva.com/1495/1669372-1495085.pdf?src-supplier=Element14, ComponentLink2URL=https://datasheet.ciiva.com/1495/1669372-1495085.pdf?src-supplier=Element14, ComponentLink3Description=https://datasheet.ciiva.com/8084/21801e-8084590.pdf?src-supplier=Avnet, ComponentLink3URL=https://datasheet.ciiva.com/8084/21801e-8084590.pdf?src-supplier=Avnet, ComponentLink4Description=https://datasheet.ciiva.com/26818/getdatasheetpartid-446810-26818853.pdf?src-supplier=Verical, ComponentLink4URL=https://datasheet.ciiva.com/26818/getdatasheetpartid-446810-26818853.pdf?src-supplier=Verical, ComponentLink5Description=https://datasheet.ciiva.com/29118/filehandler-aspxddocname-en011733-29118715.pdf?src-supplier=Digikey, ComponentLink5URL=https://datasheet.ciiva.com/29118/filehandler-aspxddocname-en011733-29118715.pdf?src-supplier=Digikey, ComponentLink6Description=https://datasheet.ciiva.com/14152/mcp2515-eng-tds-14152536.pdf?src-supplier=Distrelec, ComponentLink6URL=https://datasheet.ciiva.com/14152/mcp2515-eng-tds-14152536.pdf?src-supplier=Distrelec, ComponentLink7Description=https://datasheet.ciiva.com/1503/21801e-1503903.pdf?src-supplier=Farnell, ComponentLink7URL=https://datasheet.ciiva.com/1503/21801e-1503903.pdf?src-supplier=Farnell, ComponentLink8Description=https://datasheet.ciiva.com/16200/filehandler-aspxddocname-en011733-16200958.pdf?src-supplier=Future+Electronics, ComponentLink8URL=https://datasheet.ciiva.com/16200/filehandler-aspxddocname-en011733-16200958.pdf?src-supplier=Future+Electronics, ComponentLink9Description=https://datasheet.ciiva.com/1696/21801g-1696565.pdf?src-supplier=Digikey, ComponentLink9URL=https://datasheet.ciiva.com/1696/21801g-1696565.pdf?src-supplier=Digikey, ComponentLink10Description=https://datasheet.ciiva.com/29118/filehandler-aspxddocname-en011733-29118716.pdf?src-supplier=Digikey, ComponentLink10URL=https://datasheet.ciiva.com/29118/filehandler-aspxddocname-en011733-29118716.pdf?src-supplier=Digikey, ComponentLink11Description=https://datasheet.ciiva.com/29118/filehandler-aspxddocname-en011733-29118714.pdf?src-supplier=Digikey, ComponentLink11URL=https://datasheet.ciiva.com/29118/filehandler-aspxddocname-en011733-29118714.pdf?src-supplier=Digikey, Data Rate=1Mbps, Height=1.05mm, Interface=SPI,CAN, Item Type=IC, Lead Free="Lead Free", Length=6.6mm, Manufacturer Part Number=MCP2515T-I/ST, Mounting Technology="Surface Mount", Nominal Supply Voltage=5.5V, Number of Drivers=1, Number of Interrupts=1, Number of Receive Buffers=2, Number of Receivers=1, Number of Transceivers=1, Number of Transmit Buffers=3, Packaging="Tape and Reel", Pins=20, Pricing="1=2.67, 25=2.23, 100=2.03 (USD)", Radiation Hardening=No, Reach SVHC Compliant=No, RoHS=Yes, RoHS Compliant=Yes, Series=-, Stock=8418, Supplier=Digikey, Supply Current=10mA, Width=4.5mm
U4: "IC TRANSCEIVER HALF 1/1 8SO", LCSC Part Number=C6952, Manufacturer="NXP Semiconductors", ComponentLink1Description=https://datasheet.ciiva.com/26933/getdatasheetpartid-747091-26933446.pdf?src-supplier=Verical, ComponentLink1URL=https://datasheet.ciiva.com/26933/getdatasheetpartid-747091-26933446.pdf?src-supplier=Verical, ComponentLink2Description=https://datasheet.ciiva.com/24191/tja1050-24191228.pdf?src-supplier=Future+Electronics, ComponentLink2URL=https://datasheet.ciiva.com/24191/tja1050-24191228.pdf?src-supplier=Future+Electronics, ComponentLink3Description=https://datasheet.ciiva.com/18624/tja1050-18624869.pdf?src-supplier=Digikey, ComponentLink3URL=https://datasheet.ciiva.com/18624/tja1050-18624869.pdf?src-supplier=Digikey, ComponentLink4Description=https://datasheet.ciiva.com/29891/tja1050-29891527.pdf?src-supplier=Avnet, ComponentLink4URL=https://datasheet.ciiva.com/29891/tja1050-29891527.pdf?src-supplier=Avnet, Height=1.75mm, Item Type=IC, Manufacturer Part Number=TJA1050T/CM,118, Pricing="1=1.89, 10=1.702, 25=1.606, 100=1.3682, 250=1.28472, 500=1.12412, 1000=0.93142 (USD)", RoHS=Yes, Stock=26815, Supplier=Digikey
U5: "ARDUINO NANO ATMEGA328 EVAL BRD", Frequency=16MHz, Manufacturer=Arduino, Max Supply Voltage=12V, Min Supply Voltage=7V, Nominal Supply Current=19mA, Supplier Part Number=1050-1001-ND, ComponentLink1Description=https://datasheet.ciiva.com/1414/810078-1414124.pdf?src-supplier=Newark, ComponentLink1URL=https://datasheet.ciiva.com/1414/810078-1414124.pdf?src-supplier=Newark, ComponentLink2Description=https://datasheet.ciiva.com/4926/arduino-arduinoboardnano-188748-4926316.pdf?src-supplier=Mouser, ComponentLink2URL=https://datasheet.ciiva.com/4926/arduino-arduinoboardnano-188748-4926316.pdf?src-supplier=Mouser, ComponentLink3Description=https://datasheet.ciiva.com/2398/arduinonanomanual23-2398236.pdf?src-supplier=Digikey, ComponentLink3URL=https://datasheet.ciiva.com/2398/arduinonanomanual23-2398236.pdf?src-supplier=Digikey, ComponentLink4Description=https://datasheet.ciiva.com/1336/1682238-1336473.pdf?src-supplier=Element14, ComponentLink4URL=https://datasheet.ciiva.com/1336/1682238-1336473.pdf?src-supplier=Element14, ComponentLink5Description=https://datasheet.ciiva.com/19455/2121148-19455443.pdf?src-supplier=Jameco, ComponentLink5URL=https://datasheet.ciiva.com/19455/2121148-19455443.pdf?src-supplier=Jameco, Item Type=Module, Manufacturer Part Number=A000005, Memory Format=4498,11064MemoryType, Memory Size=32KB, Number of I/Os=22NUMBER, Pricing="1=24.9 (USD)", RoHS=Yes, Stock=2276, Supplier=Digikey
U7: "IC REG BUCK 5V 2A TSOT26", LCSC Part Number=C2071056, Manufacturer=Diodes, Supplier Part Number 1=AP63205WU-7DICT-ND, Category="Voltage Regulators - Switching", Item Type=IC, Manufacturer Part Number=AP63205WU-7, Pricing 1="1=0.88, 10=0.776, 25=0.7292, 100=0.5952, 250=0.55284, 500=0.4705, 1000=0.3764 (USD)", RoHS=Yes, Stock 1=88525, Supplier 1=Digi-Key
X1: library part 71008000RW1, "8MHz 20pF ±20ppm HC-49S Crystals ROHS", LCSC Part Number=C655216, Manufacture=HD, Package=HC-49S, ComponentLink1Description=LCSC, ComponentLink1URL=https://www.lcsc.com/product-detail/Crystals_HD-71008000RW1_C655216.html, Item Type=Crystal, Manufacture Part Number=71008000RW1

## Free pads (board coordinates)
  round 0 hole 3.1 unplated: MH5(5.651,75.641) MH5(5.651,13.063) MH5(129.349,75.641) MH5(129.349,13.063)

## Via types
v1: diameter 0.6, hole 0.3, Top Layer to Bottom Layer, 142 vias

## Nets (pads, with @x,y where several pads share a name; then routed paths per layer and width w, separated by ;. In a path a pad name is that pad's centre, name@x,y a point inside that pad or via, vN(x,y) a via of type N, cw(c..) or ccw(c..) an arc to the next point about the centre after c; other vN are vias at no path point)
5V_ECU: J1.A19 J1.B21 J1.B22 J1.C5 J1.C6 J2.C25 J3.B25 | length 122
  Top Layer w0.762: J3.B25@97.551,76.206 94.457,76.206 93.65,77.013 93.65,80.391 97.053,83.795 123.143,83.795 125.755,81.183 125.755,30.24 128.524,27.47 128.524,23.451 124.968,19.895 v1(124.968,4.052)
  other v1: 62.439,4.052 63.475,4.052 35.084,4.089 36.163,4.089 35.084,13.75 36.163,13.75 67.535,17.009 66.641,17.567 67.535,18.124
5V_REG: C1.2 C2.2 C5.1 C10.2 C11.2 C12.1 C13.1 C14.2 L1.2 R8.2 U3.20 U4.3 U5.27 U7.1 | length 10.5
  Top Layer w0.381: v1(24.105,43.856) 24.127,43.878 25.723,43.878 U7.1@25.745,43.9
  Bottom Layer w0.381: v1(24.105,43.856) 25.121,44.872 25.121,52.279
  other v1: 114.108,44.063 114.108,44.901 25.345,54.737 26.503,54.737 27.661,54.737
12V: C6.1 C7.1 C9.2 J1.A5 J1.A7 J1.A17 J1.A34 J1.B7 J1.C1 J1.D7 J2.C1 U7.2 U7.3 | length 31.5
  Top Layer w1: 29.502,40.526 29.502,41.331 32.226,44.056 32.226,69.806 32.801,70.381 J2.C1@32.801,70.706
  other v1: 42.127,33.68 43.397,33.68 90.627,33.68 91.897,33.68 99.727,33.68 100.997,33.68 18.313,33.704 18.313,35.013 18.313,36.322
"34H_B17/ 60H_C20": J2.C20 J3.B17 | length 81.1
  Bottom Layer w0.152: J2.C20@32.801,78.706 33.82,77.686 33.82,75.861 33.33,75.371 33.33,73.075 33.668,72.737 34.85,72.737 35.172,73.059 35.172,78.712 38.059,81.598 81.332,81.598 89.725,73.206 J3.B17@97.551,73.206
60H_A9/60H_C22: J2.A9 J2.C22 | length 27.8
  Top Layer w0.152: J2.C22@26.801,78.706 28.615,80.52 35.09,80.52 38.735,76.875 v1(38.735,75.481)
  Bottom Layer w0.152: v1(38.735,75.481) 38.735,72.673 40.703,70.706 J2.A9@47.301,70.706
60H_A33/60H_C15: J2.A33 J2.C15 | length 30.5